# Altium PCB PCI Express Mini_3000X5095_52PIN_Full-Mini-Type F1.PCBDOC (part 4 of 7)
Units mm, origin at the board's own origin, x right, y up, seen from the top; angles counter-clockwise.
Board outline 70 x 83.2 mm, 6 copper layers (TopLayer, Layer 1, Layer 2, Layer 3, Layer 4, Bottom Layer), stack 1.013 mm thick; 332 components, 213 nets, 1105 pads, 528 vias.
Unrouted connection lines stored in the file: 10.
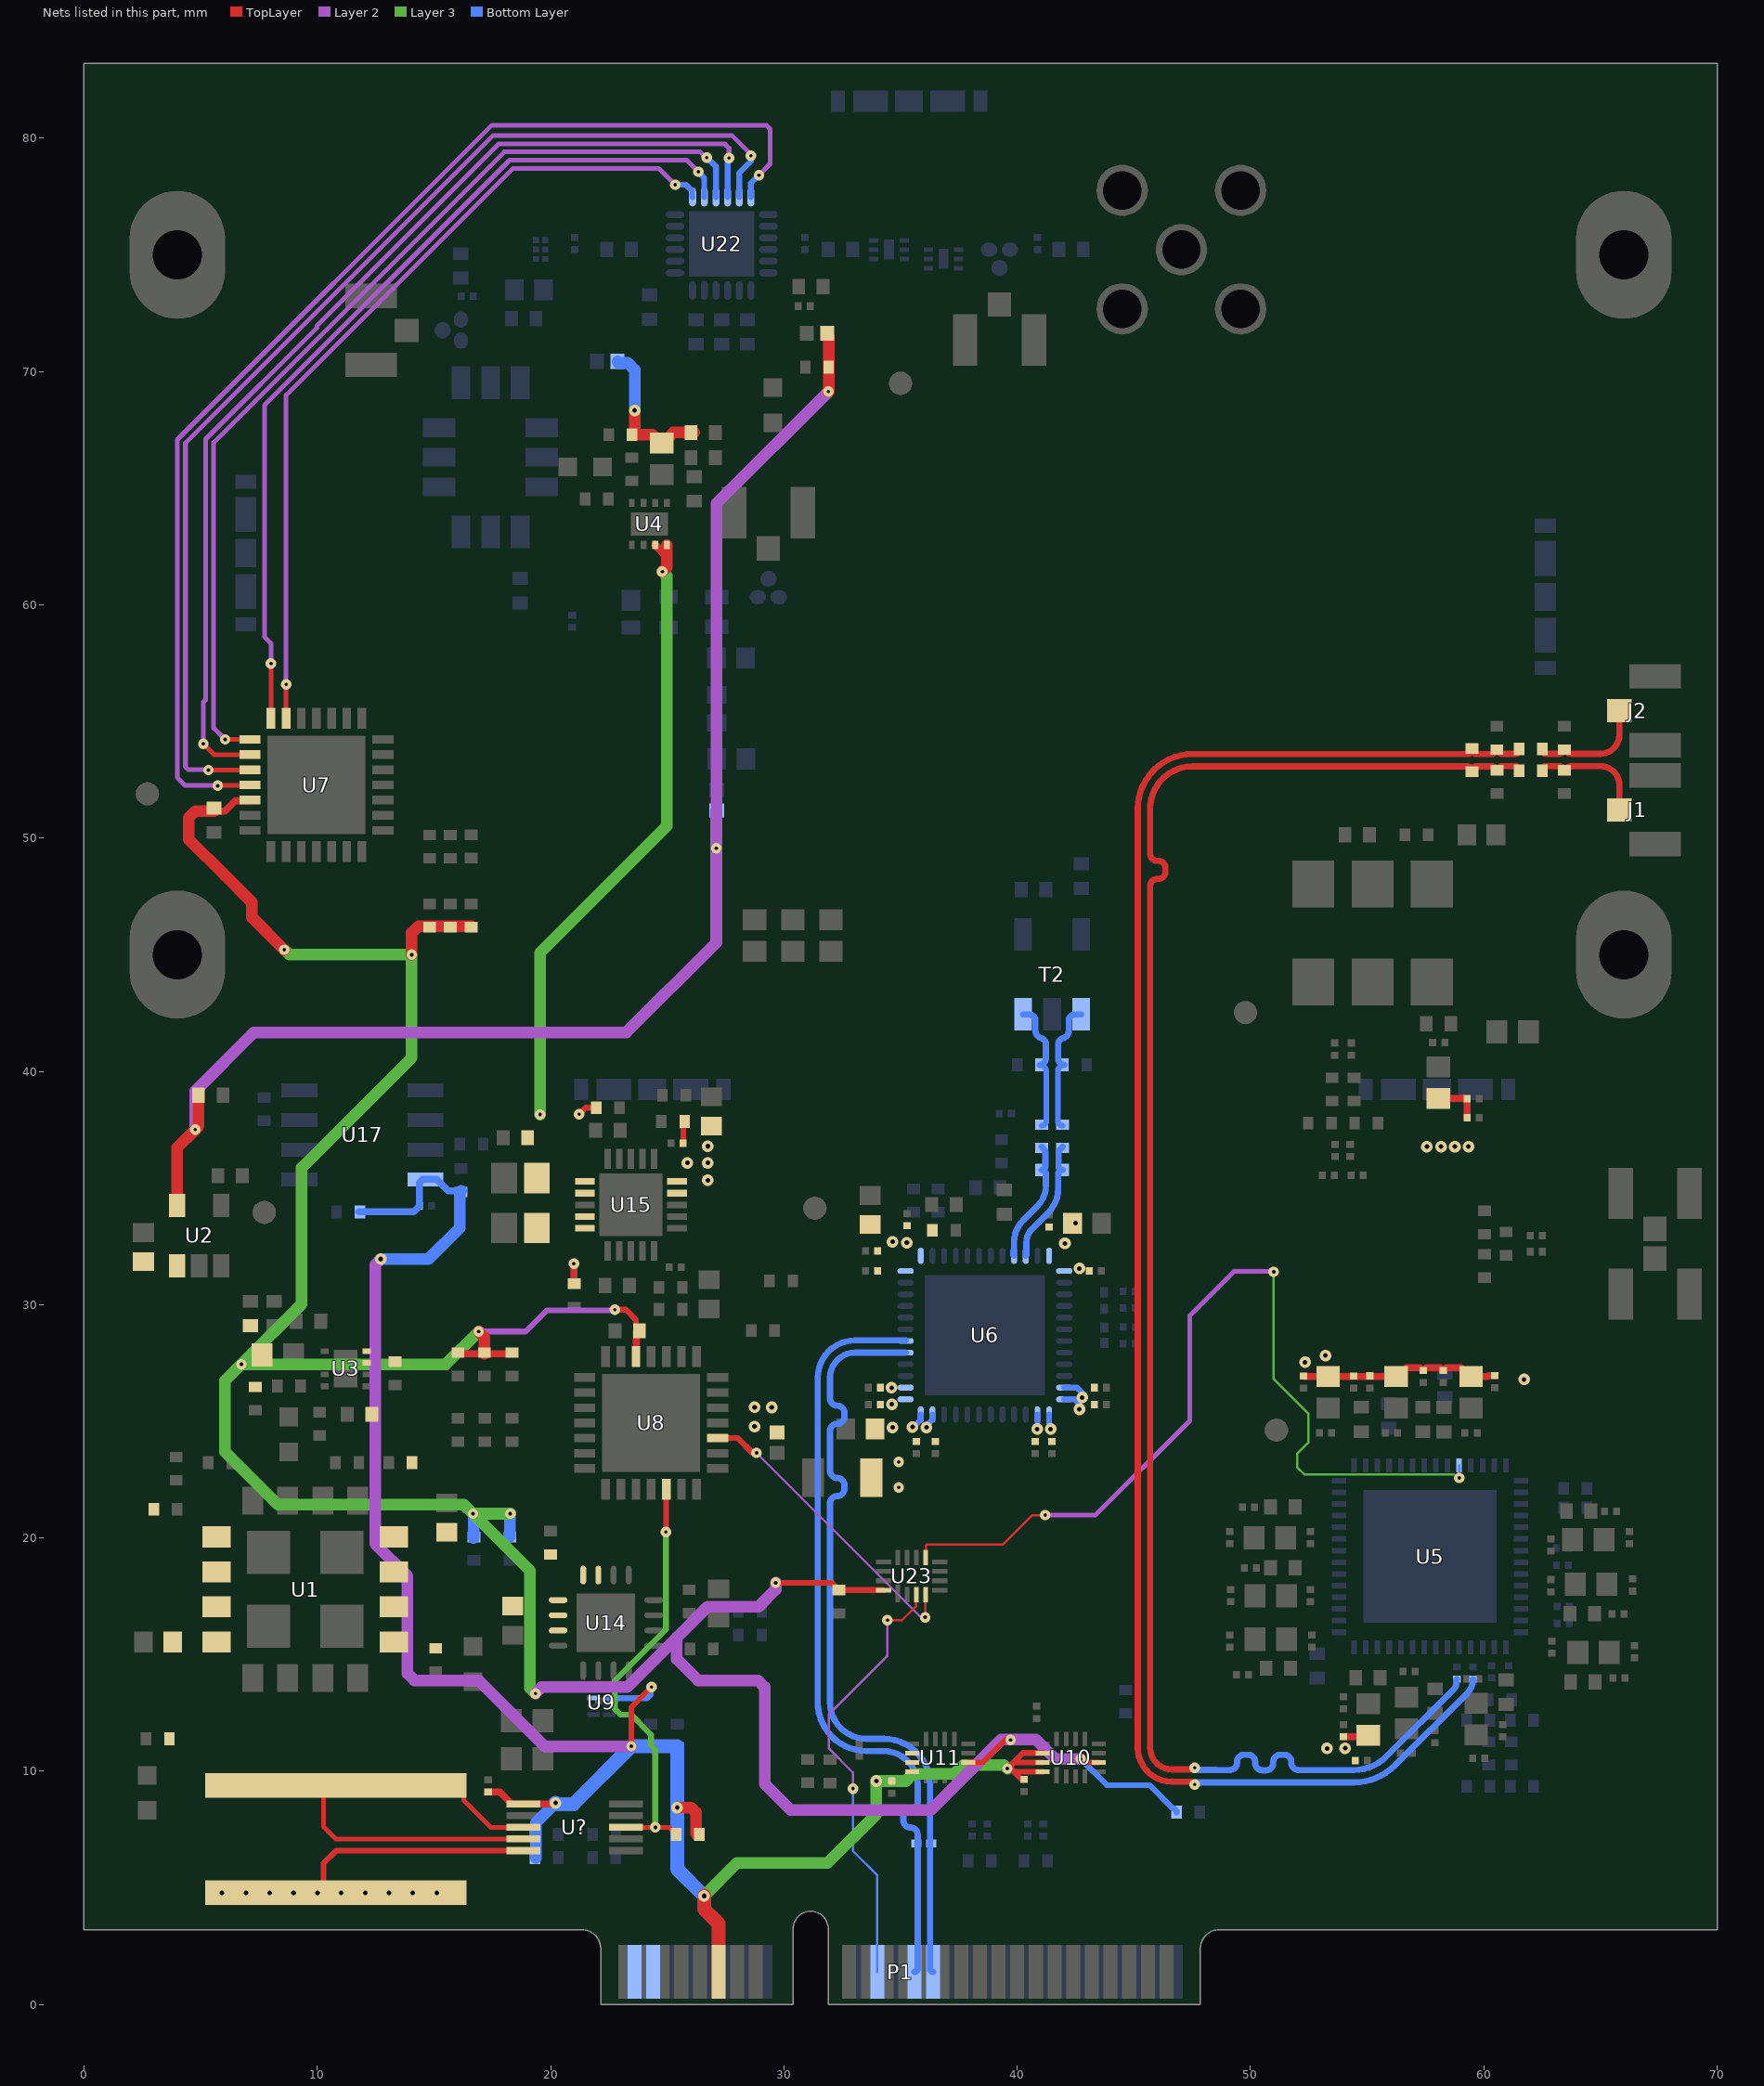
[diagram p6: the nets of this part, all layers, seen from the top]

## Part data (continued)
R104 R105: library part Resistor, "RES SMD 20K OHM 1% 1/16W 0402", Case Code (Imperial)=0402, Case Code (Metric)=1005, Manufacturer=Vishay, Manufacturer Part Number=CRCW040220K0FKED, Max Operating Temperature=155°C, Max Power Dissipation=63mW, Min Operating Temperature=-55°C, Package Quantity=10, Supplier Part Number 1=51X8496, Temperature Coefficient=100ppm/°C, Tolerance=1%, Voltage Rating=50V, Case/Package=0402, Category="Chip SMD Resistors", ComponentLink1Description=https://datasheet.ciiva.com/11810/0900766b80d98824-11810023.pdf?src-supplier=RSComponents, ComponentLink1URL=https://datasheet.ciiva.com/11810/0900766b80d98824-11810023.pdf?src-supplier=RSComponents, ComponentLink2Description=https://datasheet.ciiva.com/2463/dcrcwe3-2463139.pdf?src-supplier=Digi-Key, ComponentLink2URL=https://datasheet.ciiva.com/2463/dcrcwe3-2463139.pdf?src-supplier=Digi-Key, ComponentLink3Description=https://datasheet.ciiva.com/2463/dcrcwe3-2463140.pdf?src-supplier=Digi-Key, ComponentLink3URL=https://datasheet.ciiva.com/2463/dcrcwe3-2463140.pdf?src-supplier=Digi-Key, ComponentLink4Description=https://datasheet.ciiva.com/16886/dcrcwe3-16886581.pdf?src-supplier=Avnet+Europe, ComponentLink4URL=https://datasheet.ciiva.com/16886/dcrcwe3-16886581.pdf?src-supplier=Avnet+Europe, ComponentLink5Description=https://datasheet.ciiva.com/15159/getdatasheetpartid-93312-15159927.pdf?src-supplier=Verical, ComponentLink5URL=https://datasheet.ciiva.com/15159/getdatasheetpartid-93312-15159927.pdf?src-supplier=Verical, ComponentLink6Description=https://datasheet.ciiva.com/2463/dcrcwe3-2463141.pdf?src-supplier=Digi-Key, ComponentLink6URL=https://datasheet.ciiva.com/2463/dcrcwe3-2463141.pdf?src-supplier=Digi-Key, ComponentLink7Description=https://datasheet.ciiva.com/3256/dcrcwe3-3256213.pdf?src-supplier=Avnet, ComponentLink7URL=https://datasheet.ciiva.com/3256/dcrcwe3-3256213.pdf?src-supplier=Avnet, ComponentLink8Description=https://datasheet.ciiva.com/16725/70201119-16725214.pdf?src-supplier=Allied+Electronics, ComponentLink8URL=https://datasheet.ciiva.com/16725/70201119-16725214.pdf?src-supplier=Allied+Electronics, Composition="Thick Film", Contact Plating=Tin, Depth=0.5mm, Features="Automotive AEC-Q200", Height=0.35mm, Lead Free="Lead Free", Length=1mm, Military Standard=Not, Mount="Surface Mount", Number of Pins=2, Number of Terminations=2, Packaging="Tape and Reel", Power Rating=63mW, Radiation Hardening=No, REACH SVHC=Unknown, Resistance=20kR, RoHS=Yes, Supplier 1=Newark, Termination=SMD/SMT, Voltage Rating (DC)=50V, Weight=2.3E-05oz, Width=0.5mm, Working Voltage=50V
R106: "RES SMD 5 MOHM 5W 4320 WIDE", Case/Package=Metal, Manufacturer=Ohmite, Max Operating Temperature=155°C, Max Power Dissipation=5W, Min Operating Temperature=-55°C, Package Quantity=1, Resistance=5mR, Supplier Part Number 1=FCSL110R005FERCT-ND, Temperature Coefficient=50ppm/°C, Tolerance=1%, ComponentLink1Description=https://datasheet.ciiva.com/2484/res-fcsl-2484643.pdf?src-supplier=Digi-Key, ComponentLink1URL=https://datasheet.ciiva.com/2484/res-fcsl-2484643.pdf?src-supplier=Digi-Key, ComponentLink2Description=https://datasheet.ciiva.com/2484/res-fcsl-2484644.pdf?src-supplier=Digi-Key, ComponentLink2URL=https://datasheet.ciiva.com/2484/res-fcsl-2484644.pdf?src-supplier=Digi-Key, ComponentLink3Description=https://datasheet.ciiva.com/2484/res-fcsl-2484645.pdf?src-supplier=Digi-Key, ComponentLink3URL=https://datasheet.ciiva.com/2484/res-fcsl-2484645.pdf?src-supplier=Digi-Key, ComponentLink4Description=https://datasheet.ciiva.com/6181/fcsl-6181333.pdf?src-supplier=Farnell, ComponentLink4URL=https://datasheet.ciiva.com/6181/fcsl-6181333.pdf?src-supplier=Farnell, ComponentLink5Description=https://datasheet.ciiva.com/46422/1812595-46422917.pdf?src-supplier=Element14, ComponentLink5URL=https://datasheet.ciiva.com/46422/1812595-46422917.pdf?src-supplier=Element14, ComponentLink6Description=https://datasheet.ciiva.com/8080/fcsl-8080343.pdf?src-supplier=Element14, ComponentLink6URL=https://datasheet.ciiva.com/8080/fcsl-8080343.pdf?src-supplier=Element14, Composition="Metal Foil", Depth=5mm, Features="Moisture Resistant", Height=0.028inch, Length=0.197inch, Manufacturer Part Number=FCSL110R005FER, Number of Pins=2, Number of Terminations=2, Packaging="Tape and Reel", Power Rating=5W, Pricing 1="1 = 2,79000, 10 = 2,47700, 25 = 2,29720, 50 = 2,16220, 100 = 1,89190, 250 = 1,62164, 500 = 1,35136 (USD)", REACH SVHC=Unknown, RoHS=Yes, Stock 1=3877, Supplier 1=Digi-Key, Termination=SMD/SMT, Width=11mm
R119: library part Resistor, "RES SMD 15 OHM 0.5% 1/16W 0603", Case Code (Imperial)=0603, Case Code (Metric)=1608, Manufacturer=Susumu, Manufacturer Part Number=RR0816Q-150-D, Max Operating Temperature=125°C, Max Power Dissipation=63mW, Min Operating Temperature=-55°C, Package Quantity=1, Resistor Type="Thin Film", Supplier Part Number 1=RR08Q15DCT-ND, Temperature Coefficient=50ppm/°C, Tolerance=0.5%, Voltage Rating=75V, Case/Package=0603, Category="Chip SMD Resistors", ComponentLink1Description=https://datasheet.ciiva.com/11820/0900766b80808d64-11820652.pdf?src-supplier=RSComponents, ComponentLink1URL=https://datasheet.ciiva.com/11820/0900766b80808d64-11820652.pdf?src-supplier=RSComponents, ComponentLink2Description=https://datasheet.ciiva.com/2497/rr-data-sheet-2497981.pdf?src-supplier=Digi-Key, ComponentLink2URL=https://datasheet.ciiva.com/2497/rr-data-sheet-2497981.pdf?src-supplier=Digi-Key, ComponentLink3Description=https://datasheet.ciiva.com/2497/rr-data-sheet-2497982.pdf?src-supplier=Digi-Key, ComponentLink3URL=https://datasheet.ciiva.com/2497/rr-data-sheet-2497982.pdf?src-supplier=Digi-Key, ComponentLink4Description=https://datasheet.ciiva.com/2497/rr-data-sheet-2497983.pdf?src-supplier=Digi-Key, ComponentLink4URL=https://datasheet.ciiva.com/2497/rr-data-sheet-2497983.pdf?src-supplier=Digi-Key, Depth=0.8mm, Height=0.4mm, Lead Free="Lead Free", Length=1.6mm, Number of Pins=2, Number of Terminations=2, Packaging="Tape and Reel", Power Rating=63mW, Pricing 1="1=0,10000, 10=0,09300, 100=0,03580, 1000=0,01575, 2500=0,01360 (USD)", REACH SVHC=Unknown, Resistance=15R, RoHS=Yes, Stock 1=15480, Supplier 1=Digi-Key, Termination=SMD/SMT, Voltage Rating (DC)=75V, Width=0.8mm
R120 R124 R125: library part Resistor, "PANASONIC - ERJ2GEJ151X - SMD Chip Resistor, 0402 [1005 Metric], 150 ohm, ERJ2GE Series, 50 V, Thick Film, 100 mW", Case Code (Imperial)=0402, Case Code (Metric)=1005, Manufacturer=Panasonic, Manufacturer Part Number=ERJ-2GEJ151X, Max Operating Temperature=155°C, Max Power Dissipation=100mW, Min Operating Temperature=-55°C, Package Quantity=1, Supplier Part Number 1=P150JCT-ND, Temperature Coefficient=200ppm/°C, Tolerance=5%, Voltage Rating=50V, Case/Package=0402, Category="Chip SMD Resistors", ComponentLink1Description=https://datasheet.ciiva.com/11821/0900766b80f806dd-11821182.pdf?src-supplier=RSComponents, ComponentLink1URL=https://datasheet.ciiva.com/11821/0900766b80f806dd-11821182.pdf?src-supplier=RSComponents, ComponentLink2Description=https://datasheet.ciiva.com/30178/4aoa0000ce1-30178453.pdf?src-supplier=Onlinecomponents.com, ComponentLink2URL=https://datasheet.ciiva.com/30178/4aoa0000ce1-30178453.pdf?src-supplier=Onlinecomponents.com, ComponentLink3Description=https://datasheet.ciiva.com/6082/1500035-6082105.pdf?src-supplier=Farnell, ComponentLink3URL=https://datasheet.ciiva.com/6082/1500035-6082105.pdf?src-supplier=Farnell, ComponentLink4Description=https://datasheet.ciiva.com/28568/1678796-28568939.pdf?src-supplier=Element14, ComponentLink4URL=https://datasheet.ciiva.com/28568/1678796-28568939.pdf?src-supplier=Element14, ComponentLink5Description=https://datasheet.ciiva.com/16773/70260739-16773454.pdf?src-supplier=Allied+Electronics, ComponentLink5URL=https://datasheet.ciiva.com/16773/70260739-16773454.pdf?src-supplier=Allied+Electronics, ComponentLink6Description=https://datasheet.ciiva.com/46377/1500035-46377070.pdf?src-supplier=Element14, ComponentLink6URL=https://datasheet.ciiva.com/46377/1500035-46377070.pdf?src-supplier=Element14, ComponentLink7Description=https://datasheet.ciiva.com/43460/1500035-43460367.pdf?src-supplier=Farnell, ComponentLink7URL=https://datasheet.ciiva.com/43460/1500035-43460367.pdf?src-supplier=Farnell, Composition="Thick Film", Contact Plating=Tin, Depth=0.5mm, Features="Automotive AEC-Q200", Height=0.35mm, Lead Free="Lead Free", Length=1mm, Military Standard=Not, Mount="Surface Mount", Number of Terminations=2, Packaging="Tape and Reel", Power Rating=100mW, Pricing 1="1=0,10000, 10=0,03100, 100=0,01280, 1000=0,00575, 2500=0,00499, 5000=0,00412 (USD)", Radiation Hardening=No, REACH SVHC="No SVHC", Resistance=150R, RoHS=Yes, Stock 1=677433, Supplier 1=Digi-Key, Termination=SMD/SMT, Voltage Rating (DC)=50V, Weight=2.8E-05oz, Width=0.5mm, Working Voltage=50V
R122: library part Resistor, "Res Thick Film 0402 330 Ohm 1% 0.1W(1/10W) ±100ppm/C Pad SMD Automotive T/R", Case Code (Imperial)=0402, Case Code (Metric)=1005, Manufacturer="KOA Speer", Manufacturer Part Number=RK73H1ETTP3300F, Max Operating Temperature=155°C, Min Operating Temperature=-55°C, Package Quantity=10000, Power Rating=63mW, Supplier Part Number 1=2019-RK73H1ETTP3300FCT-ND, Temperature Coefficient=100ppm/°C, Tolerance=1%, Voltage Rating=50V, Case/Package=0402, Category="Chip SMD Resistors", ComponentLink1Description=https://datasheet.ciiva.com/5555/rk73h-5555909.pdf?src-supplier=Mouser, ComponentLink1URL=https://datasheet.ciiva.com/5555/rk73h-5555909.pdf?src-supplier=Mouser, ComponentLink2Description=https://datasheet.ciiva.com/15203/getdatasheetpartid-424481-15203100.pdf?src-supplier=Verical, ComponentLink2URL=https://datasheet.ciiva.com/15203/getdatasheetpartid-424481-15203100.pdf?src-supplier=Verical, Composition="Thick Film", Depth=0.5mm, Height=0.35mm, Lead Free="Lead Free", Length=1mm, Military Standard=Not, Packaging="Tape and Reel", Pricing 1="1=0,10000, 10=0,02300, 100=0,00940, 1000=0,00421, 2500=0,00366, 5000=0,00302 (USD)", Resistance=330R, RoHS=Yes, Stock 1=525212, Supplier 1=Digi-Key, Termination=SMD/SMT, Voltage Rating (DC)=50V, Width=0.5mm
T2: Case/Package=SMD/SMT, Manufacturer="TE Connectivity MA-COM", Max DC Current=30mA, Max Operating Temperature=85°C, Min Operating Temperature=-40°C, Package Quantity=2000, Power Rating=250mW, Supplier Part Number 1=937-MABA007159000000, ComponentLink1Description=https://datasheet.ciiva.com/3295/maba-007159-000000-3295941.pdf?src-supplier=Avnet, ComponentLink1URL=https://datasheet.ciiva.com/3295/maba-007159-000000-3295941.pdf?src-supplier=Avnet, ComponentLink2Description=https://datasheet.ciiva.com/4550/maba-007159-000000-13414-4550885.pdf?src-supplier=Mouser, ComponentLink2URL=https://datasheet.ciiva.com/4550/maba-007159-000000-13414-4550885.pdf?src-supplier=Mouser, ComponentLink3Description=https://datasheet.ciiva.com/29655/maba-007159-000000-29655720.pdf?src-supplier=Digi-Key, ComponentLink3URL=https://datasheet.ciiva.com/29655/maba-007159-000000-29655720.pdf?src-supplier=Digi-Key, ComponentLink4Description=https://datasheet.ciiva.com/29655/maba-007159-000000-29655722.pdf?src-supplier=Digi-Key, ComponentLink4URL=https://datasheet.ciiva.com/29655/maba-007159-000000-29655722.pdf?src-supplier=Digi-Key, Depth=3.81mm, Height=2.67mm, Lead Free="Lead Free", Lead/Base Style="Gull Wing", Length=3.81mm, Manufacturer Part Number=MABA-007159-000000, Mount="Surface Mount", Number of Pins=5, Packaging="Tape and Reel", Pricing 1="1 = 1,75000, 10 = 1,41000, 50 = 1,41000, 100 = 1,13000, 1000 = 0,88000, 10000 = 0,68800 (USD)", Radiation Hardening=No, RoHS=Yes, Stock 1=6455, Supplier 1=Mouser, Termination=SMD/SMT, Turns Ratio=1:1, Width=3.81mm
U1: library part 171031801, "DC DC CONVERTER 0.8V-17V", Input Voltage=4-18V, Manufacturer="Wurth Elektronik", Max Input Voltage=18V, Max Operating Temperature=85°C, Max Output Current=3A, Min Input Voltage=4V, Min Operating Temperature=-40°C, Operating Temperature="-40 to +125degC", Output Voltage=0.8-17V, Supplier Part Number 1=732-12297-1-ND, Voltage - Output 1=17V, Category="Board Mount Modules", ComponentLink1Description=Manufacturer, ComponentLink1URL=http://www.we-online.de, ComponentLink2Description=Datasheet, ComponentLink2URL=https://katalog.we-online.de/pm/datasheet/171031801.pdf, ComponentLink3Description=https://katalog.we-online.de/pm/datasheet/171031801.pdf?src-supplier=Digi-Key, ComponentLink3URL=https://katalog.we-online.de/pm/datasheet/171031801.pdf?src-supplier=Digi-Key, Efficiency=95%, Features=UVLO,OCP,OTP,SCP, Manufacturer Part Number=171031801, Mount="Surface Mount", Mounting Technology=SMT, Number of Outputs=1, Output Current=3A, Packaging="Tape and Reel", Pricing 1="1=9,28000, 10=8,53900, 50=8,00360 (USD)", Published Date="April 2020", RoHS=No, Size=LGA-16EP, Stock 1=530, Supplier 1=Digi-Key
U2: "IC REG LINEAR 5V 300MA SOT23-5", Case/Package=SOT-23-5, Dropout Voltage=250mV, Manufacturer=Diodes, Max Input Voltage=13.2V, Max Operating Temperature=125°C, Max Output Current=300mA, Min Input Voltage=2.5V, Min Operating Temperature=-40°C, Output Voltage=5V, Package Quantity=3000, Power Supply Rejection Ratio (PSRR)=75dB, Quiescent Current=150uA, Supplier Part Number 1=AP2210K-5.0TRG1DICT-ND, Accuracy=1%, Category="Voltage Regulators - Linear", ComponentLink1Description=https://datasheet.ciiva.com/29569/ap2210-29569974.pdf?src-supplier=Digi-Key, ComponentLink1URL=https://datasheet.ciiva.com/29569/ap2210-29569974.pdf?src-supplier=Digi-Key, ComponentLink2Description=https://datasheet.ciiva.com/29569/ap2210-29569975.pdf?src-supplier=Digi-Key, ComponentLink2URL=https://datasheet.ciiva.com/29569/ap2210-29569975.pdf?src-supplier=Digi-Key, ComponentLink3Description=https://datasheet.ciiva.com/29569/ap2210-29569976.pdf?src-supplier=Digi-Key, ComponentLink3URL=https://datasheet.ciiva.com/29569/ap2210-29569976.pdf?src-supplier=Digi-Key, Lead Free="Lead Free", Manufacturer Part Number=AP2210K-5.0TRG1, Mount="Surface Mount", Number of Outputs=1, Number of Pins=5, Number of Regulators=1, Output Current=300mA, Output Type=Fixed, Packaging="Tape and Reel", Polarity=Positive, Pricing 1="1=0,42000, 10=0,34200, 25=0,31280, 100=0,21090, 250=0,17452, 500=0,15998, 1000=0,11999 (USD)", RoHS=Yes, Stock 1=36767, Supplier 1=Digi-Key, Weight=0.001058oz
U3 U4: "IC REG LIN POS ADJ 500MA 8LFCSP", Case/Package=MSOP, Dropout Voltage=130mV, Manufacturer="Analog Devices", Max Input Voltage=5.5V, Max Operating Temperature=125°C, Max Output Current=500mA, Max Output Voltage=5V, Max Supply Current=210uA, Min Current Limit=550mA, Min Input Voltage=2.3V, Min Operating Temperature=-40°C, Min Output Voltage=800mV, Nominal Supply Current=45uA, Power Supply Rejection Ratio (PSRR)=60dB, Reference Voltage=500mV, Supplier Part Number 1=2457144, Accuracy=1%, ComponentLink1Description=https://datasheet.ciiva.com/17365/adp124-125-17365589.pdf?src-supplier=Avnet+Europe, ComponentLink1URL=https://datasheet.ciiva.com/17365/adp124-125-17365589.pdf?src-supplier=Avnet+Europe, ComponentLink2Description=https://datasheet.ciiva.com/2056/adp124-125-2056955.pdf?src-supplier=Digi-Key, ComponentLink2URL=https://datasheet.ciiva.com/2056/adp124-125-2056955.pdf?src-supplier=Digi-Key, ComponentLink3Description=https://datasheet.ciiva.com/2056/adp124-125-2056954.pdf?src-supplier=Digi-Key, ComponentLink3URL=https://datasheet.ciiva.com/2056/adp124-125-2056954.pdf?src-supplier=Digi-Key, ComponentLink4Description=https://datasheet.ciiva.com/2056/adp124-125-2056956.pdf?src-supplier=Digi-Key, ComponentLink4URL=https://datasheet.ciiva.com/2056/adp124-125-2056956.pdf?src-supplier=Digi-Key, ComponentLink5Description=https://datasheet.ciiva.com/48694/001251247-da-01-en-ic-reg-l-adj-adp125acpz-r7-lfcspud-8-adi-48694599.pdf?src-supplier=Conrad, ComponentLink5URL=https://datasheet.ciiva.com/48694/001251247-da-01-en-ic-reg-l-adj-adp125acpz-r7-lfcspud-8-adi-48694599.pdf?src-supplier=Conrad, ComponentLink6Description=http://datasheet.octopart.com/ADP125ACPZ-R7-Analog-Devices-datasheet-11525030.pdf?src-supplier=Newark, ComponentLink6URL=http://datasheet.octopart.com/ADP125ACPZ-R7-Analog-Devices-datasheet-11525030.pdf?src-supplier=Newark, ComponentLink7Description=http://datasheet.octopart.com/ADP125ACPZ-R7-Analog-Devices-datasheet-38878834.pdf?src-supplier=Newark, ComponentLink7URL=http://datasheet.octopart.com/ADP125ACPZ-R7-Analog-Devices-datasheet-38878834.pdf?src-supplier=Newark, ComponentLink8Description=http://datasheet.octopart.com/ADP125ACPZ-R7-Analog-Devices-datasheet-10623001.pdf?src-supplier=Analog+Devices, ComponentLink8URL=http://datasheet.octopart.com/ADP125ACPZ-R7-Analog-Devices-datasheet-10623001.pdf?src-supplier=Analog+Devices, ComponentLink9Description=http://datasheet.octopart.com/ADP125ACPZ-R7-Analog-Devices-datasheet-8638579.pdf?src-supplier=Analog+Devices, ComponentLink9URL=http://datasheet.octopart.com/ADP125ACPZ-R7-Analog-Devices-datasheet-8638579.pdf?src-supplier=Analog+Devices, ComponentLink10Description=http://datasheet.octopart.com/ADP125ACPZ-R7-Analog-Devices-datasheet-11776558.pdf?src-supplier=Arrow, ComponentLink10URL=http://datasheet.octopart.com/ADP125ACPZ-R7-Analog-Devices-datasheet-11776558.pdf?src-supplier=Arrow, Contact Plating=Gold, Height=0.6mm, Lead Free="Contains Lead", Length=2mm, Manufacturer 2="Analog Devices", Manufacturer Part Number=ADP125ACPZ-R7, Manufacturer Part Number 2=ADP125ACPZ-R7, Number of Outputs=1, Number of Pins=8, Number of Regulators=1, Operating Supply Current=45uA, Output Current=500mA, Output Type=Adjustable, Output Voltage=5V, Packaging="Tape and Reel", Polarity=Positive, Pricing 2="1=1.39000, 10=1.23900, 25=1.17600, 100=0.96600, 250=0.90300, 500=0.79800, 1000=0.63000 (USD)", Quiescent Current=45uA, REACH SVHC="No SVHC", RoHS=Yes, Stock 1=261, Stock 2=12322, Supplier 1=Farnell, Supplier 2=Digi-Key, Supplier Part Number 2=ADP125ACPZ-R7CT-ND, Width=2mm
U5: Case/Package=QFN, Manufacturer="Texas Instruments", Max Frequency=6.175GHz, Max Operating Temperature=85°C, Min Operating Temperature=-40°C, Supplier Part Number 1=296-51339-1-ND, Category="Clock Generators, PLLs, Frequency Synthesizers", ComponentLink1Description=http://www.ti.com/lit/ds/symlink/lmk04610.pdf?src-supplier=Digi-Key, ComponentLink1URL=http://www.ti.com/lit/ds/symlink/lmk04610.pdf?src-supplier=Digi-Key, Input=LVCMOS, Manufacturer Part Number=LMK04610RTQR, Mount="Surface Mount", Number of Circuits=1, Number of Inputs=2, Number of Outputs=10, Packaging="Tape and Reel", PLL=Yes, Pricing 1="1 = 20,47000, 10 = 18,87700, 100 = 16,11940, 500 = 14,63474 (USD)", Pricing 2="1=32,35000, 10=29,84000, 25=28,49880, 100=25,48130 (USD)", RoHS=No, Stock 1=2022, Stock 2=150, Supplier 1=Digi-Key, Supplier 2=Digi-Key, Supplier Part Number 2=296-48594-1-ND
U6: "IC ADC 14BIT 170MSPS 48QFN", Case/Package=QFN, Manufacturer="Analog Devices / Linear Technology", Max Operating Temperature=85°C, Max Supply Voltage=1.9V, Min Operating Temperature=-40°C, Min Supply Voltage=1.7V, Supplier Part Number 1=LTC2122IUK#PBF-ND, Category="Analog to Digital Converters (ADCs)", ComponentLink1Description=http://www.linear.com/docs/45350?src-supplier=Digi-Key, ComponentLink1URL=http://www.linear.com/docs/45350?src-supplier=Digi-Key, ComponentLink2Description=http://www.farnell.com/datasheets/1968213.pdf?src-supplier=Element14, ComponentLink2URL=http://www.farnell.com/datasheets/1968213.pdf?src-supplier=Element14, Interface=SPI, Manufacturer Part Number=LTC2122IUK#PBF, Number of A/D Converters=2, Number of Bits=14, Number of Inputs=2, Number of Pins=48, Packaging=Tray, Pricing 1="1=105,29000, 25=102,14040 (USD)", REACH SVHC="No SVHC", Resolution=14b, RoHS=Yes, Sampling Rate=170000000S/s, Stock 1=52, Supplier 1=Digi-Key
U7 U8: "IC I/O EXPANDER I2C 16B 28QFN", Case/Package=QFN, Frequency=1.7MHz, Manufacturer=Microchip, Max Operating Temperature=125°C, Min Operating Temperature=-40°C, Operating Supply Voltage=5.5V, Output Current=25mA, Package Quantity=1600, Power Dissipation=700mW, Supplier Part Number 1=MCP23017T-E/MLCT-ND, ComponentLink1Description=https://datasheet.ciiva.com/1780/21952b-1780757.pdf?src-supplier=Digi-Key, ComponentLink1URL=https://datasheet.ciiva.com/1780/21952b-1780757.pdf?src-supplier=Digi-Key, ComponentLink2Description=https://datasheet.ciiva.com/16454/filehandler-aspxddocname-en023709-16454263.pdf?src-supplier=Future+Electronics, ComponentLink2URL=https://datasheet.ciiva.com/16454/filehandler-aspxddocname-en023709-16454263.pdf?src-supplier=Future+Electronics, ComponentLink3Description=https://datasheet.ciiva.com/8128/21952b-8128584.pdf?src-supplier=Avnet, ComponentLink3URL=https://datasheet.ciiva.com/8128/21952b-8128584.pdf?src-supplier=Avnet, Contact Plating=Tin,Matte, Interface=I2C,Serial, Lead Free="Lead Free", Manufacturer Part Number=MCP23017T-E/ML, Max Frequency=1.7MHz, Number of Bits=16, Number of I/Os=16, Packaging="Tape and Reel", Pricing 1="1 = 1,45000, 25 = 1,21560, 100 = 1,10210 (USD)", RoHS=Yes, Stock 1=7016, Supplier 1=Digi-Key
U9: "TEXAS INSTRUMENTS   PCA9306DQER.   IC, SMBus, 5V, X2SON-8", Low Level Output Current=128mA, Manufacturer 1="Texas Instruments", Max Operating Temperature=85°C, Max Supply Voltage=5V, Min Operating Temperature=-40°C, Min Supply Voltage=0uV, Package Quantity=1, Supplier Part Number 1=296-27957-1-ND, ComponentLink1Description=https://datasheet.ciiva.com/22631/1719693-22631024.pdf?src-supplier=Element14, ComponentLink1URL=https://datasheet.ciiva.com/22631/1719693-22631024.pdf?src-supplier=Element14, ComponentLink2Description=https://datasheet.ciiva.com/1899/pca9306-1899328.pdf?src-supplier=Digi-Key, ComponentLink2URL=https://datasheet.ciiva.com/1899/pca9306-1899328.pdf?src-supplier=Digi-Key, ComponentLink3Description=https://datasheet.ciiva.com/15095/getdatasheetpartid-306496-15095555.pdf?src-supplier=Verical, ComponentLink3URL=https://datasheet.ciiva.com/15095/getdatasheetpartid-306496-15095555.pdf?src-supplier=Verical, ComponentLink4Description=https://datasheet.ciiva.com/1504/1862428-1504149.pdf?src-supplier=Element14, ComponentLink4URL=https://datasheet.ciiva.com/1504/1862428-1504149.pdf?src-supplier=Element14, ComponentLink5Description=https://datasheet.ciiva.com/1899/pca9306-1899326.pdf?src-supplier=Digi-Key, ComponentLink5URL=https://datasheet.ciiva.com/1899/pca9306-1899326.pdf?src-supplier=Digi-Key, ComponentLink6Description=https://datasheet.ciiva.com/14287/pca9306-14287374.pdf?src-supplier=Avnet, ComponentLink6URL=https://datasheet.ciiva.com/14287/pca9306-14287374.pdf?src-supplier=Avnet, ComponentLink7Description=https://datasheet.ciiva.com/14287/pca9306-14287470.pdf?src-supplier=Avnet, ComponentLink7URL=https://datasheet.ciiva.com/14287/pca9306-14287470.pdf?src-supplier=Avnet, ComponentLink8Description=https://datasheet.ciiva.com/1899/pca9306-1899327.pdf?src-supplier=Digi-Key, ComponentLink8URL=https://datasheet.ciiva.com/1899/pca9306-1899327.pdf?src-supplier=Digi-Key, ComponentLink9Description=https://datasheet.ciiva.com/26041/pca9306-26041014.pdf?src-supplier=Avnet+Europe, ComponentLink9URL=https://datasheet.ciiva.com/26041/pca9306-26041014.pdf?src-supplier=Avnet+Europe, Height=0.35mm, Lead Free="Lead Free", Length=1.45mm, Logic Function=Translator, Manufacturer Part Number 1=PCA9306DQER, Number of Bits=2, Number of Channels=2, Number of Outputs=2, Number of Pins=8, Output Type=I2C, Packaging="Tape and Reel", Pricing 1="1=0,67000, 10=0,59100, 100=0,45340, 500=0,35844, 1000=0,28675 (USD)", Propagation Delay=0.3ns, Radiation Hardening=No, REACH SVHC="No SVHC", RoHS=Yes, Stock 1=25002, Supplier 1=Digi-Key, Turn-On Delay Time=1.4ns, Width=1.05mm
U10 U11: "4-bit dual-supply bus transceiver with 3-state outputs and independent direction control inputs 16-UQFN -40 to 125", Manufacturer="Texas Instruments", Supplier Part Number 1=296-SN74AXC4T774RSVRCT-ND, Category="Buffers, Drivers and Transceivers", Manufacturer Part Number=SN74AXC4T774RSVR, Pricing 1="1=1,21000, 10=1,08600, 25=1,03040, 100=0,84640, 250=0,79120, 500=0,69920, 1000=0,55200 (USD)", RoHS=No, Stock 1=2179, Supplier 1=Digi-Key
U14: "2 A, Low VIN, Low Dropout Linear Regulator, 1.6 to 3.6 V Vin, 0.75 to 3 V Vout, Industrial, 16-pin QFN (CP-16-13), Reel", Manufacturer="Analog Devices", Supplier Part Number 1=ADP1741ACPZ-R7TR-ND, Supply Current IGND @ Small Load=90uA, Code_JEDEC=MO-220-VGGC., ComponentLink1Description="Manufacturer URL", ComponentLink1URL=http://www.analog.com/en/index.html, ComponentLink2Description=Datasheet, ComponentLink2URL=http://www.analog.com/static/imported-files/data_sheets/ADP1740_1741.pdf, ComponentLink3Description="Package Specification", ComponentLink3URL=http://www.analog.com/static/imported-files/packages/PKG_PDF/LFCSP(CP)/CP-16/CP_16_13.pdf, ComponentLink4Description="URL Link1", ComponentLink4URL="Product URL:http://www.analog.com/en/ADP1741/productSearch.html", DatasheetVersion="Rev. D", Iout max=2A, Mounting Technology="Surface Mount", PackageDescription="16-Pin Lead Frame Chip Scale Package, Body 4 x 4 mm, Pitch 0.65 mm", PackageReference=CP-16-13, PackageVersion="031006-A, 06/2006", Packing=Reel, PartNumber=ADP1741ACPZ-R7, Supplier 1=Digi-Key, Supplier 2=Digi-Key, Supplier 3=Digi-Key, Supplier 4=Newark, Supplier 5=Newark, Supplier 6=Mouser, Supplier Part Number 2=ADP1741ACPZ-R7CT-ND, Supplier Part Number 3=ADP1741ACPZ-R7DKR-ND, Supplier Part Number 4=72W4083, Supplier Part Number 5=34P3050, Supplier Part Number 6=584-ADP1741ACPZ-R7, Vin (max) (V)=3.6, Vin (min) (V)=1.6, Vout Adjustable Range="0.75V to 3.3V"
U15: "IC REG LINEAR POS ADJ 1A 20QFN", Case/Package=QFN, Dropout Voltage=130mV, Manufacturer="Texas Instruments", Max Operating Temperature=125°C, Min Current Limit=1.5A, Min Operating Temperature=-40°C, Output Current=1A, Output Voltage=5V, Quiescent Current=2mA, Supplier Part Number 1=296-43312-1-ND, Category="Voltage References", ComponentLink1Description=http://www.ti.com/lit/gpn/tps7a88?src-supplier=Mouser, ComponentLink1URL=http://www.ti.com/lit/gpn/tps7a88?src-supplier=Mouser, ComponentLink2Description=http://www.ti.com/lit/ds/symlink/tps7a88.pdf?src-supplier=Digi-Key, ComponentLink2URL=http://www.ti.com/lit/ds/symlink/tps7a88.pdf?src-supplier=Digi-Key, ComponentLink3Description=http://www.ti.com/general/docs/lit/getliterature.tsp?genericPartNumber=TPS7A88&amp;&amp;fileType=pdf&src-supplier=Farnell, ComponentLink3URL=http://www.ti.com/general/docs/lit/getliterature.tsp?genericPartNumber=TPS7A88&amp;&amp;fileType=pdf&src-supplier=Farnell, Lead Free="Lead Free", Manufacturer Part Number=TPS7A8801RTJT, Mount="Surface Mount", Number of Outputs=2, Number of Pins=20, Number of Regulators=2, Packaging="Tape and Reel", Pricing 1="1=2,77000, 10=2,48700, 25=2,34600, 100=1,87670 (USD)", RoHS=Yes, Stock 1=1455, Supplier 1=Digi-Key
U17: "1.7-5.5V 1MHZ IND TMP 8-SOIC-N", Manufacturer=Microchip, Supplier Part Number 1=AT24CM02-SSHM-TCT-ND, ComponentLink1Description=http://www.microchip.com/mymicrochip/filehandler.aspx?ddocname=en589710&src-supplier=Digi-Key, ComponentLink1URL=http://www.microchip.com/mymicrochip/filehandler.aspx?ddocname=en589710&src-supplier=Digi-Key, Manufacturer Part Number=AT24CM02-SSHM-T, Pricing 1="1 = 2,51000, 25 = 2,42040, 100 = 2,41540 (USD)", RoHS=No, Stock 1=24235, Supplier 1=Digi-Key
U18: "Silicon Germanium Broadband MMIC Amplifier, DC-6 GHz, 17.5 dB Gain, SOT343, Green", Frequency (f)="DC-6 GHz", Manufacturer=Infineon, Supplier Part Number 1=N/A, ComponentLink1Description="Manufacturer URL", ComponentLink1URL=http://www.infineon.com/, ComponentLink2Description=Datasheet, ComponentLink2URL=http://www.infineon.com/dgdl/BGA616.pdf?folderId=db3a30431441fb5d0114b654e6581730&fileId=db3a304314dca3890115419102bb163b&location=en.Products.RF.RF_MMIC.CATV___Broadband_Amplifier.DATASHEET.BGA616.pdf, ComponentLink3Description="Package Specification", ComponentLink3URL=http://www.infineon.com/dgdl/SOT343-Package_Overview.pdf?folderId=db3a30431936bc4b0119535155343cba&fileId=db3a30431936bc4b0119535a9f393cd3, DatasheetVersion="Rev. 2.1", F (typ)="2.9 dB", Gain (typ)="17.5 dB", Green=yes, Halogen-free=yes, I (typ)="60 mA", Mounting Technology="Surface Mount", P-1dB (in)=+18, PackageDescription="4-Pin Small Outline Transistor Package, 1.25 x 2 mm Body", PackageReference=SOT343, PartNumber=BGA616, Supplier 1=Mouser, Supplier 2=Digi-Key, Supplier Part Number 2=BGA616H6327XTSA1CT-ND
U19: Frequency=70-1000GHz, Supplier Part Number 1=BGA729N6E6327XTSA1CT-ND, Part Number=BGA729N6, Supplier 1=Digi-Key
U22: "ANALOG DEVICES   HMC472ALP4E   RF ATTENUATOR, 3.8GHZ, 5.5V, HQFN-24", Attenuation Value=31.5dB, Case/Package=SMD/SMT, Manufacturer="Analog Devices", Max Frequency=3.8GHz, Max Input Voltage=5.5V, Max Operating Temperature=85°C, Max Power Dissipation=560mW, Min Input Voltage=4.5V, Min Operating Temperature=-40°C, Operating Supply Voltage=5V, Package Quantity=50, Supplier Part Number 1=1127-3157-ND, ComponentLink1Description=http://www.mouser.com/ds/2/609/hmc472a-879296.pdf?src-supplier=Mouser, ComponentLink1URL=http://www.mouser.com/ds/2/609/hmc472a-879296.pdf?src-supplier=Mouser, ComponentLink2Description=http://www.analog.com/media/en/technical-documentation/data-sheets/hmc472a.pdf?src-supplier=Avnet+Asia, ComponentLink2URL=http://www.analog.com/media/en/technical-documentation/data-sheets/hmc472a.pdf?src-supplier=Avnet+Asia, ComponentLink3Description=http://www.farnell.com/datasheets/1868224.pdf?src-supplier=Element14, ComponentLink3URL=http://www.farnell.com/datasheets/1868224.pdf?src-supplier=Element14, ComponentLink4Description=https://www.hittite.com/content/documents/data_sheet/hmc472alp4.pdf?src-supplier=Avnet, ComponentLink4URL=https://www.hittite.com/content/documents/data_sheet/hmc472alp4.pdf?src-supplier=Avnet, ComponentLink5Description=https://www.analog.com/media/en/technical-documentation/data-sheets/hmc472a.pdf?src-supplier=Digi-Key, ComponentLink5URL=https://www.analog.com/media/en/technical-documentation/data-sheets/hmc472a.pdf?src-supplier=Digi-Key, Contact Plating=Tin,Matte, Impedance=50R, Insertion Loss=3dB, Lead Free="Contains Lead", Manufacturer Part Number=HMC472ALP4E, Max Supply Voltage=5.5V, Min Supply Voltage=4.5V, Mount="Surface Mount", Number of Bits=6, Number of Channels=1, Number of Pins=24, Packaging="Cut Tape", Pricing 1="1 = 7,47000, 10 = 6,84400, 25 = 6,22160, 100 = 5,59940, 250 = 5,13284, 500 = 4,66620, 1000 = 4,19958 (USD)", REACH SVHC="No SVHC", RoHS=Yes, Stock 1=867, Supplier 1=Digi-Key
U23: "IC TRNSLTR BIDIRECTIONAL 16UQFN", High Level Output Current=-20uA, Low Level Output Current=20uA, Manufacturer 1="Texas Instruments", Max Operating Temperature=85°C, Max Supply Voltage=3.6V, Min Operating Temperature=-40°C, Min Supply Voltage=900mV, Nominal Supply Current=5uA, Package Quantity=1, Quiescent Current=10uA, Supplier Part Number 1=296-29681-1-ND, ComponentLink1Description=https://datasheet.ciiva.com/1900/txb0304-1900817.pdf?src-supplier=Digi-Key, ComponentLink1URL=https://datasheet.ciiva.com/1900/txb0304-1900817.pdf?src-supplier=Digi-Key, ComponentLink2Description=https://datasheet.ciiva.com/15096/getdatasheetpartid-490462-15096317.pdf?src-supplier=Verical, ComponentLink2URL=https://datasheet.ciiva.com/15096/getdatasheetpartid-490462-15096317.pdf?src-supplier=Verical, ComponentLink3Description=https://datasheet.ciiva.com/1900/txb0304-1900818.pdf?src-supplier=Digi-Key, ComponentLink3URL=https://datasheet.ciiva.com/1900/txb0304-1900818.pdf?src-supplier=Digi-Key, ComponentLink4Description=https://datasheet.ciiva.com/1900/txb0304-1900819.pdf?src-supplier=Digi-Key, ComponentLink4URL=https://datasheet.ciiva.com/1900/txb0304-1900819.pdf?src-supplier=Digi-Key, ComponentLink5Description=https://datasheet.ciiva.com/14287/txb0304-14287243.pdf?src-supplier=Avnet, ComponentLink5URL=https://datasheet.ciiva.com/14287/txb0304-14287243.pdf?src-supplier=Avnet, Contact Plating=Gold, Data Rate=140Mbps, Lead Free="Lead Free", Logic Function=Translator, Manufacturer Part Number 1=TXB0304RSVR, Mount="Surface Mount", Number of Bits=4, Number of Channels=4, Number of Inputs=4, Number of Outputs=4, Number of Pins=16, Packaging="Tape and Reel", Pricing 1="1=1.45000, 10=1.29700, 100=1.01160, 500=0.83564, 1000=0.65972 (USD)", Propagation Delay=4.8ns, Radiation Hardening=No, REACH SVHC="No SVHC", RoHS=Yes, Stock 1=1758, Supplier 1=Digi-Key, Turn-On Delay Time=18.9ns
U?: "IC MONITOR PWR/CURR BIDIR 10MSOP", Case/Package=VSSOP, Input Bias Current=10uA, Input Offset Voltage (Vos)=2.5uV, Manufacturer="Texas Instruments", Max Operating Temperature=125°C, Max Supply Voltage=5.5V, Min Operating Temperature=-40°C, Min Supply Voltage=2.7V, Nominal Supply Current=330uA, Output Current=10mA, Package Quantity=1, Supplier Part Number 1=296-29034-1-ND, Accuracy=0.02%, Common Mode Rejection Ratio=140dB, ComponentLink1Description=https://datasheet.ciiva.com/1939/ina226-1939633.pdf?src-supplier=Digi-Key, ComponentLink1URL=https://datasheet.ciiva.com/1939/ina226-1939633.pdf?src-supplier=Digi-Key, ComponentLink2Description=https://datasheet.ciiva.com/4875/sbos547-126280-4875559.pdf?src-supplier=Mouser, ComponentLink2URL=https://datasheet.ciiva.com/4875/sbos547-126280-4875559.pdf?src-supplier=Mouser, ComponentLink3Description=https://datasheet.ciiva.com/1939/ina226-1939634.pdf?src-supplier=Digi-Key, ComponentLink3URL=https://datasheet.ciiva.com/1939/ina226-1939634.pdf?src-supplier=Digi-Key, ComponentLink4Description=https://datasheet.ciiva.com/1939/ina226-1939635.pdf?src-supplier=Digi-Key, ComponentLink4URL=https://datasheet.ciiva.com/1939/ina226-1939635.pdf?src-supplier=Digi-Key, ComponentLink5Description=https://datasheet.ciiva.com/14196/ina226-14196741.pdf?src-supplier=Avnet, ComponentLink5URL=https://datasheet.ciiva.com/14196/ina226-14196741.pdf?src-supplier=Avnet, ComponentLink6Description=https://datasheet.ciiva.com/22693/1840205-22693516.pdf?src-supplier=Element14, ComponentLink6URL=https://datasheet.ciiva.com/22693/1840205-22693516.pdf?src-supplier=Element14, Contact Plating=Gold, Lead Free="Lead Free", Manufacturer Part Number=INA226AIDGSR, Mount="Surface Mount", Number of Pins=10, Packaging="Tape and Reel", Pricing 1="1 = 2,88000, 10 = 2,58900, 100 = 2,12100, 500 = 1,80554, 1000 = 1,52275 (USD)", Radiation Hardening=No, REACH SVHC="No SVHC", RoHS=Yes, Stock 1=62024, Supplier 1=Digi-Key
X1: "OSC VCXO 122.88MHZ LVPECL SMD", Case/Package=SMD/SMT, Frequency=122.88MHz, Manufacturer=Epson, Max Operating Temperature=85°C, Max Supply Current=65mA, Min Operating Temperature=-40°C, Supplier Part Number 1=SER3907CT-ND, ComponentLink1Description=https://datasheet.ciiva.com/29626/vg-4513ca-partnumber-29626986.pdf?src-supplier=Digi-Key, ComponentLink1URL=https://datasheet.ciiva.com/29626/vg-4513ca-partnumber-29626986.pdf?src-supplier=Digi-Key, ComponentLink2Description=https://datasheet.ciiva.com/29626/vg-4513ca-partnumber-29626987.pdf?src-supplier=Digi-Key, ComponentLink2URL=https://datasheet.ciiva.com/29626/vg-4513ca-partnumber-29626987.pdf?src-supplier=Digi-Key, ComponentLink3Description=https://datasheet.ciiva.com/29626/076-vg-4513ca-cb-e13ya-29626988.pdf?src-supplier=Digi-Key, ComponentLink3URL=https://datasheet.ciiva.com/29626/076-vg-4513ca-cb-e13ya-29626988.pdf?src-supplier=Digi-Key, Height=0.071inch, Lead Free="Lead Free", Length=0.276inch, Manufacturer Part Number=VG-4513CA122.8800M-GFCT3, Mount="Surface Mount", Packaging="Tape and Reel", Pricing 1="1 = 9,91000, 10 = 9,29000, 50 = 8,97980, 100 = 8,67020 (USD)", RoHS=Yes, Stock 1=438, Supplier 1=Digi-Key, Width=0.197inch

## Free pads (board coordinates)
  oval 4.1x5.5 hole 2.1 slot 4 at 90 deg unplated: ""(4,45) ""(4,75) ""(66,45) ""(66,75)

## Via types
v1: diameter 0.45, hole 0.15, TopLayer to Bottom Layer, tented both sides, 263 vias
v2: diameter 0.5, hole 0.2, TopLayer to Bottom Layer, tented both sides, 200 vias
v3: diameter 0.5, hole 0.2, TopLayer to Bottom Layer, 36 vias
v4: diameter 0.45, hole 0.15, TopLayer to Bottom Layer, 29 vias

## Nets (pads, with @x,y where several pads share a name; then routed paths per layer and width w, separated by ;. In a path a pad name is that pad's centre, name@x,y a point inside that pad or via, vN(x,y) a via of type N, cw(c..) or ccw(c..) an arc to the next point about the centre after c; other vN are vias at no path point)
0F_N: P1.26 R17.1 U6.41 | length 33.6
  Bottom Layer w0.267: U6.41@35.217,27.942 33.053,27.942 ccw(c33.053,26.867) 31.977,26.867 31.977,25.98 ccw(c32.287,25.98) 32.287,25.67 cw(c32.287,25.36) 32.597,25.36 32.597,25.205 cw(c32.287,25.205) 32.287,24.895 ccw(c32.287,24.585) 31.977,24.585 31.977,22.88 ccw(c32.287,22.88) 32.287,22.57 cw(c32.287,22.26) 32.597,22.26 32.597,22.105 cw(c32.287,22.105) 32.287,21.795 ccw(c32.287,21.485) 31.977,21.485 31.977,20.576 31.977,12.956 ccw(c33.542,12.956) 33.542,11.391 34.275,11.391 cw(c34.275,9.403) 36.264,9.403 36.264,6.902 36.264,1.536 ccw(c36.4,1.536) P1.26@36.4,1.4
0F_P: P1.24 R17.2 U6.42 | length 33.7
  Bottom Layer w0.267: U6.42@35.217,28.469 33.053,28.469 ccw(c33.053,26.867) 31.45,26.867 31.45,12.956 ccw(c33.542,12.956) 33.542,10.864 34.275,10.864 cw(c34.275,9.403) 35.737,9.403 35.737,8.672 cw(c35.427,8.672) 35.427,8.362 ccw(c35.426,8.052) 35.116,8.052 35.116,7.897 ccw(c35.426,7.897) 35.426,7.587 cw(c35.427,7.277) 35.737,7.277 35.737,7.143 35.737,1.537 cw(c35.6,1.537) P1.24@35.6,1.4
2V8_RF: C13.2 FB2.2 FB22.1 R125.2 | length 6.7
  TopLayer w0.5: v2(23.607,68.332) 23.607,67.291 23.898,67.291 24.355,67.291 24.715,66.931 FB2.2@24.765,66.931 ; FB2.2@24.838,67.004 FB2.2@24.765,66.931 ; C13.2@26.152,67.381 C13.2@26.017,67.381 25.265,67.381 24.815,66.931 FB2.2@24.765,66.931
  Bottom Layer w0.5: FB22.1@22.87,70.434 22.87,70.414 22.92,70.364 23.314,70.364 23.607,70.071 v2(23.607,68.332)
3V3_DIGIT: C9.2 C67.2 C68.2 FB1.2 R10.1 R11.1 R57.1 R58.1 R59.1 R64.1 R67.1 R68.1 R69.1 R75.1 R124.2 U7.5 U8.5 U9.7 U10.6 U11.6 U23.16 | length 141.4
  TopLayer w0.25: v1(22.753,29.785) 23.227,29.785 23.66,29.351 23.66,28.891 C67.2@23.675,28.876 ; v1(29.653,18.079) 32.035,18.079 32.199,17.914 32.199,17.864 32.299,17.764 R75.1@32.349,17.764 U23.16@34.277,17.764 ; U11.6@37.9,10.379 38.531,10.379 v4@39.506,11.354 ; v1(42.72,10.523) 42.774,10.523 42.917,10.379 U10.6@43.495,10.379
  TopLayer w0.3: C68.2@5.576,51.154 6.036,51.154 6.477,51.595 7.084,51.595 U7.5@7.117,51.627 ; R69.1@16.032,27.892 17.162,27.892 R67.1@18.351,27.892 ; U8.5@23.66,27.779 23.668,27.787 23.668,28.868 C67.2@23.675,28.876
  TopLayer w0.5: C68.2@5.576,51.154 4.781,51.154 4.488,50.861 4.488,49.951 6.05,48.389 7.195,47.244 7.195,46.604 v1(8.587,45.212) ; v1(14.046,45) 14.046,45.934 14.339,46.227 R59.1@16.596,46.227 ; v1(16.916,28.848) 17.162,28.603 R68.1@17.162,27.942 R68.1@17.162,27.892
  Layer 2 w0.25: v1(16.916,28.848) 18.935,28.848 19.844,29.757 22.726,29.757 v1(22.753,29.785)
  Layer 2 w0.5: v1(19.349,13.333) 19.617,13.6 23.279,13.6 25.406,15.728 ; v1(29.653,18.079) 29.653,17.795 28.907,17.05 26.729,17.05 25.406,15.728 ; v1(42.72,10.523) 41.641,10.523 40.809,11.354 39.308,11.354 36.289,8.335 30.306,8.335 29.179,9.462 29.179,13.601 28.886,13.894 26.318,13.894 25.406,14.806 25.406,15.728
  Layer 3 w0.5: v1(8.587,45.212) 8.596,45.212 8.808,45 v1(14.046,45) 14.046,40.586 9.332,35.871 9.332,30.023 v1(6.751,27.442) ; v1(16.916,28.848) 15.51,27.442 v1(6.751,27.442) ; v1(18.273,21.04) v1(16.674,21.04) ; v1(19.349,13.333) 19.12,13.562 19.12,14.729 19.12,18.594 v1(16.674,21.04) ; v1(6.751,27.442) 6.05,26.741 6.05,23.693 8.319,21.425 16.289,21.425 v1(16.674,21.04)
  Bottom Layer w0.25: v1(42.72,10.523) 43.84,9.403 45.669,9.403 46.68,8.391 46.73,8.391 46.83,8.291 R64.1@46.83,8.241
  Bottom Layer w0.5: v1(16.674,21.04) 16.711,21.003 R10.1@16.711,20.039 R10.1@16.711,19.989 ; R11.1@18.257,20.064 18.257,21.024 v1(18.273,21.04)
  other v4: 39.717,11.343
3V3_MB: C14.1 C70.1 C153.2 C154.2 P1.11 R65.2 R66.2 R107.2 R110.1 R111.1 R112.2 R113.2 U9.2 U10.14 U10.15 U10.16 U11.14 U11.15 U11.16 U17.8 U?.6 | length 91.7
  TopLayer w0.25: v4(23.465,11.069) 23.465,12.747 v1(24.327,13.609) ; v4@39.717,10.117 39.855,9.979 ; C70.1@40.287,9.65 40.262,9.675 40.158,9.675 39.855,9.979 ; U10.16@41.095,9.979 39.855,9.979 ; U10.15@41.095,10.379 39.883,10.379 39.621,10.117 v4(39.58,10.117) 40.242,10.779 U10.14@41.095,10.779
  TopLayer w0.3: C153.2@17.323,9.107 17.812,9.107 18.291,8.627 18.291,8.594 U?.6@18.827,8.594 20.111,8.594 20.155,8.638 v2(20.209,8.638)
  TopLayer w0.5: v2(25.429,8.437) 26.024,8.437 26.229,8.232 26.229,7.335 26.279,7.285 R107.2@26.329,7.285
  TopLayer w0.6: v2(26.579,4.655) 26.579,4.093 27.2,3.472 P1.11@27.2,1.4
  Layer 2 w0.5: v2(12.725,31.953) 12.48,31.708 12.48,19.753 13.868,18.364 13.868,14.187 14.161,13.894 16.916,13.894 19.741,11.069 v4(23.465,11.069)
  Layer 3 w0.5: v2(26.579,4.655) 27.995,6.071 31.873,6.071 33.959,8.156 v2(33.959,9.58) 35.23,9.58 35.541,9.891 37.318,9.891 37.69,10.264 39.433,10.264 v4(39.58,10.117)
  Bottom Layer w0.25: U9.2@22.514,13.131 24.142,13.131 24.289,13.279 24.289,13.571 v1(24.327,13.609)
  Bottom Layer w0.3: R113.2@11.777,33.977 R113.2@11.827,33.977 14.133,33.977 14.377,34.221 C154.2@14.377,34.231 14.377,35.224 14.527,35.374 U17.8@14.637,35.374 15.112,35.374 15.605,34.88 R112.2@16.161,34.88
  Bottom Layer w0.5: v2(12.725,31.953) 14.774,31.953 16.111,33.29 16.111,34.83 R112.2@16.161,34.88 ; R111.1@19.38,6.294 19.378,6.297 19.378,7.282 19.375,7.285 19.375,7.805 v2(20.209,8.638)
  Bottom Layer w0.6: v2(20.209,8.638) 20.255,8.592 20.988,8.592 v4(23.465,11.069) 25.429,11.069 R66.2@25.429,11.019 v2(25.429,8.437) 25.429,5.805 v2(26.579,4.655)
3V6_DCDC: C2.2 C6.2 C10.2 C91.2 C139.2 C140.2 R2.2 R97.2 R120.2 R123.1 U1.9 U1.10 U1.11 U1.12 U3.7 U3.8 U4.7 U4.8 U14.1 U14.2 U14.3 U14.15 U14.16 U15.1 U15.2 U15.4 U15.5 | length 27.5
  TopLayer w0.35: U4.7@24.484,62.563 24.984,62.063
  TopLayer w0.5: v1(24.789,61.424) 24.984,61.619 24.984,62.063 U4.8@24.984,62.563
  Layer 3 w0.5: v1(19.554,38.149) 19.554,45.089 24.979,50.514 24.979,61.234 v1(24.789,61.424)
5V: C4.2 FB24.1 FB26.1 R122.2 U2.5 | length 61.5
  TopLayer w0.5: U2.5@3.988,34.258 3.988,36.72 v1(4.768,37.5) 4.909,37.641 C4.2@4.909,38.978 ; FB24.1@31.86,71.635 31.86,71.573 31.852,71.565 31.91,71.565 31.91,71.506 31.92,71.496 R122.2@31.92,70.18 31.92,69.151 v1(31.91,69.141)
  Layer 2 w0.5: v1(4.768,37.5) 4.768,39.146 7.286,41.663 23.248,41.663 27.102,45.517 v1(27.102,49.56) 27.119,49.577 27.119,64.35 v1(31.91,69.141)
  Bottom Layer w0.5: v1(27.102,49.56) 27.102,51.166 FB26.1@27.119,51.182
12V: C1.2 C3.2 R1.2 R106.2 R121.2 U1.1 U1.2 U1.3 U1.4 U2.1 U?.8 U?.9 | length 19.7
  TopLayer w0.2: U?.9@18.827,7.094 10.793,7.094 10.267,7.62 10.267,8.965 10.692,9.39 15.862,9.39 16.287,8.965 16.287,8.74 17.433,7.594 U?.8@18.827,7.594
2122_0VDD: C88.2 C89.2 C90.2 C179.2 FB7.2 U6.25 U6.26 U6.35 U6.36 | length 2.7
  Bottom Layer w0.25: v2(35.509,24.753) 35.553,24.753 35.867,25.067 U6.36@35.867,25.292 ; v2(36.109,24.732) 36.157,24.78 36.157,24.857 36.367,25.067 U6.35@36.367,25.292 ; v2(40.855,24.668) 40.867,24.681 U6.26@40.867,25.292 ; U6.25@41.367,25.292 41.367,24.799 41.431,24.736 v2(41.431,24.668)
  other v4: 34.924,22.166 34.924,23.254
2122_VCC: C76.2 C77.2 C78.2 C79.2 C80.2 C81.2 C82.2 C83.2 C84.2 C85.2 C86.2 C87.2 FB6.2 R96.1 U6.1 U6.12 U6.13 U6.23 U6.24 U6.37 U6.38 U6.48 | length 2
  Bottom Layer w0.25: U6.24@42.017,25.942 42.452,25.942 42.669,25.725 v2(42.669,25.516) ; U6.23@42.017,26.442 42.561,26.442 42.786,26.218 v2(42.786,26.018)
  other v2: 34.658,24.731 28.744,24.772 28.744,25.603 29.48,25.597 34.631,25.734 34.615,26.438 42.669,31.552 42.044,32.622 35.27,32.652 34.661,32.692 42.507,33.486
4610_FINE_V: C93.2 C94.2 C97.2 C98.2 C101.2 C102.2 C105.2 C106.2 C109.2 C110.2 C129.2 C130.2 FB8.1 FB9.1 FB10.1 FB11.1 FB12.1 R100.2 R104.2 R105.2 U15.14 U15.15 | length 14.7
  TopLayer w0.25: v1(21.223,38.16) 21.505,38.442 R104.2@22.01,38.442 ; C130.2@25.68,36.925 25.688,36.934 25.688,37.847 R100.2@25.696,37.855
  TopLayer w0.3: v1(20.999,31.75) 21.01,31.739 R105.2@21.01,30.845 ; C105.2@52.273,26.941 52.283,26.941 52.311,26.913 FB11.1@53.322,26.913 56.289,26.913 56.675,27.299 57.262,27.299 57.388,27.173 57.408,27.173 57.535,27.299 58.126,27.299 58.252,27.173 58.272,27.173 58.399,27.299 59.018,27.299 59.404,26.913 60.164,26.913 60.218,26.967 C93.2@60.462,26.967 ; C98.2@53.978,11.474 54.979,11.474 FB9.1@55.049,11.544 ; FB12.1@58.054,38.836 C110.2@59.278,38.836 C109.2@59.278,38.01
  other v2: 53.282,10.975 54.057,10.988 61.73,26.792 52.34,27.53 53.213,27.817 26.741,35.328 25.86,36.08 26.741,36.08 26.741,36.788 57.558,36.77 58.164,36.77 58.758,36.77 59.344,36.77
04610_Stat1: U5.10 U23.9 | length 39.8
  TopLayer w0.1: U23.9@36.077,19.164 36.077,19.663 36.135,19.722 39.397,19.722 40.654,20.979 v4@41.241,20.979
  Layer 2 w0.1: v1@50.973,31.424 v1(50.994,31.402)
  Layer 2 w0.2: v4(41.201,20.979) 43.353,20.979 47.396,25.023 47.396,29.527 49.293,31.424 v1@50.973,31.424
  Layer 3 w0.1: v1(50.994,31.402) 50.994,26.811 52.488,25.317 52.488,24.103 51.997,23.612 51.997,23.033 52.31,22.719 58.715,22.719 58.79,22.644 58.849,22.644 v1@58.924,22.719
  Bottom Layer w0.1: U5.10@58.943,23.106 58.946,23.103 58.946,22.577 v1(58.949,22.574)
04610_Stat1_3V3: U8.24 U23.4 | length 13.1
  TopLayer w0.1: v1(36.059,16.598) 36.06,16.6 36.06,17.548 U23.4@36.077,17.564
  TopLayer w0.25: U8.24@27.16,24.279 28.023,24.279 28.656,23.647 v1(28.829,23.647)
  Layer 2 w0.1: v1(28.829,23.647) 28.829,23.637 35.867,16.598 v1(36.059,16.598)
+12: P1.2 P1.4 R106.1 U?.10 | length 10.3
  TopLayer w0.25: R106.1@10.789,4.79 10.692,4.79 10.267,5.215 10.267,6.053 10.808,6.594 U?.10@18.827,6.594
  other v2: 5.921,4.776 6.942,4.776 7.964,4.776 8.986,4.776 10.008,4.776 11.029,4.776 12.051,4.776 13.073,4.776 14.095,4.776 15.117,4.776
AIn_2122_B_N: R53.1 R56.2 U6.9 | length 5.4
  Bottom Layer w0.268: U6.9@39.867,32.092 39.839,32.12 39.839,32.291 cw(c39.887,32.291) 39.853,32.325 ccw(c39.819,32.359) 39.867,32.359 39.867,32.682 cw(c41.182,32.682) 40.252,33.612 40.875,34.235 ccw(c40.011,35.099) 41.233,35.099 41.233,35.585 ccw(c41.047,35.585) 41.047,35.771 ccw(c41.047,35.937) 41.213,35.937 41.213,36.507 ccw(c40.988,36.507) R56.2@41.147,36.666 ; R56.2@41.047,36.766 R56.2@41.147,36.666
AIn_2122_B_P: R51.2 R53.2 U6.10 | length 5.4
  Bottom Layer w0.268: U6.10@40.367,32.092 40.395,32.12 40.395,32.678 cw(c41.191,32.678) 40.628,33.241 41.326,33.939 ccw(c40.275,34.989) 41.761,34.989 41.761,35.585 cw(c41.947,35.585) 41.947,35.771 cw(c41.947,35.947) 41.771,35.947 41.771,36.403 ccw(c41.747,36.427) 41.781,36.427 41.781,36.507 cw(c42.007,36.507) 41.847,36.666 R51.2@41.947,36.766
AIn_2122B_N: R55.1 R56.1 T2.1 | length 5.8
  Bottom Layer w0.234: R55.1@40.956,40.275 cw(c40.956,39.975) 41.255,39.975 41.255,37.874 cw(c41.047,37.874) R56.1@41.047,37.666
  Bottom Layer w0.267: T2.1@40.248,42.443 40.518,42.443 cw(c40.518,42.176) 40.785,42.176 40.785,41.743 ccw(c41.118,41.743) 41.032,41.421 cw(c40.962,41.163) 41.229,41.163 41.229,40.548 cw(c40.956,40.548) R55.1@40.956,40.275
AIn_2122B_P: R51.1 R52.2 T2.3 | length 5.9
  Bottom Layer w0.234: R51.1@41.947,37.666 cw(c41.947,37.874) 41.739,37.874 41.739,39.984 cw(c42.03,39.984) R52.2@42.03,40.275
  Bottom Layer w0.267: R52.2@42.03,40.275 cw(c42.03,40.548) 41.756,40.548 41.756,40.925 41.756,41.16 cw(c42.023,41.16) 41.959,41.419 ccw(c41.878,41.743) 42.212,41.743 42.212,42.176 cw(c42.479,42.176) 42.479,42.443 T2.3@42.748,42.443
Alert_curr_vol_meas: R107.1 U8.19 U?.3 | length 18.7
  TopLayer w0.2: U?.3@23.227,7.594 v1(24.491,7.594) 25.069,7.594 R107.1@25.379,7.285 R107.1@25.429,7.285
  TopLayer w0.25: v1(24.945,20.249) 24.953,20.257 24.953,22.072 U8.19@24.96,22.079
  Layer 3 w0.25: v1(24.491,7.594) 24.491,10.926 24.31,11.107 24.31,11.563 23.446,12.427 22.99,12.427 22.753,12.664 22.753,13.889 24.945,16.081 v1(24.945,20.249)
ATT_TETRA_V1: U7.27 U22.19 | length 36
  TopLayer w0.2: U7.27@8.667,55.127 v1(8.667,56.583)
  Layer 2 w0.2: v1(8.667,56.583) 8.667,68.983 18.392,78.708 24.631,78.708 v1(25.337,78.002)
  Bottom Layer w0.25: v1(25.337,78.002) 25.809,78.002 26.071,77.741 26.071,77.491 U22.19@26.087,77.475
ATT_TETRA_V2: U7.28 U22.20 | length 37.9
  TopLayer w0.2: U7.28@8.017,55.127 v1(8.017,57.48)
  Layer 2 w0.2: v1(8.017,57.48) 8.017,58.346 7.739,58.624 7.739,68.55 18.247,79.058 25.836,79.058 v1(26.332,78.562)
  Bottom Layer w0.25: v1(26.332,78.562) 26.332,78.547 26.587,78.292 U22.20@26.587,77.475
ATT_TETRA_V3: U7.1 U22.21 | length 42.2
  TopLayer w0.2: v1(6.05,54.227) U7.1@7.117,54.227
  Layer 2 w0.2: v1(6.05,54.227) 5.563,54.715 5.563,66.954 18.016,79.408 26.413,79.408 26.648,79.173 v1(26.694,79.173)
  Bottom Layer w0.25: v1(26.694,79.173) 27.087,78.78 U22.21@27.087,77.475
ATT_TETRA_V4: U7.2 U22.22 | length 45.2
  TopLayer w0.2: v1(5.117,54.034) 5.574,53.577 U7.2@7.117,53.577
  Layer 2 w0.2: v1(5.117,54.034) 5.117,55.826 5.213,55.922 5.213,67.099 9.982,71.869 9.982,71.958 17.782,79.758 27.462,79.758 27.649,79.571 v1(27.649,79.148)
  Bottom Layer w0.25: U22.22@27.587,77.475 27.587,79.086 v1(27.649,79.148)
ATT_TETRA_V5: U7.3 U22.23 | length 48.8
  TopLayer w0.2: v1(5.338,52.913) 5.345,52.92 7.109,52.92 U7.3@7.117,52.927
  Layer 2 w0.2: v1(5.338,52.913) 5.323,52.927 4.467,52.927 4.35,53.045 4.35,66.932 17.526,80.108 27.783,80.108 28.587,79.303 v1(28.587,79.248)
  Bottom Layer w0.2: v1@5.284,52.913 v1(5.338,52.913)
  Bottom Layer w0.25: U22.23@28.087,77.475 28.087,78.505 28.587,79.005 v1(28.587,79.248)
ATT_TETRA_V6: U7.4 U22.24 | length 52.1
  TopLayer w0.2: v1(5.735,52.242) 5.753,52.26 7.099,52.26 U7.4@7.117,52.277